# EAGLE board restrict_wires (EAGLE 9.6.2)

Size 20 x 20 mm. Coordinates in mm from the lower left corner, seen from the top.
Outline: 0,0 20,0 20,20 0,20 0,0
Copper layers used: 
tRestrict: 1 lines
bRestrict: 1 lines
vRestrict: 1 lines

## Footprints (pad centres in the part's own frame; a part is rotated, then mirrored left to right if it is on the bottom)
WIRE-RESTRICT = smd 1 x 1: 1 0,0

## Placement (x,y rotation side)
KO1  [WIRE-RESTRICT]  12,12 0 top

## Library data of the parts
KO1 = restrict-test